# Altium PCB PowerCutMonitor-v1.0.PcbDoc (part 2 of 2)
Units mil, origin at the board's own origin, x right, y up, seen from the top; angles counter-clockwise.
Board outline 3267.72 x 1141.73 mil, 2 copper layers (Top Layer, Bottom Layer), stack 61.811 mil thick; 45 components, 28 nets, 151 pads, 51 vias.
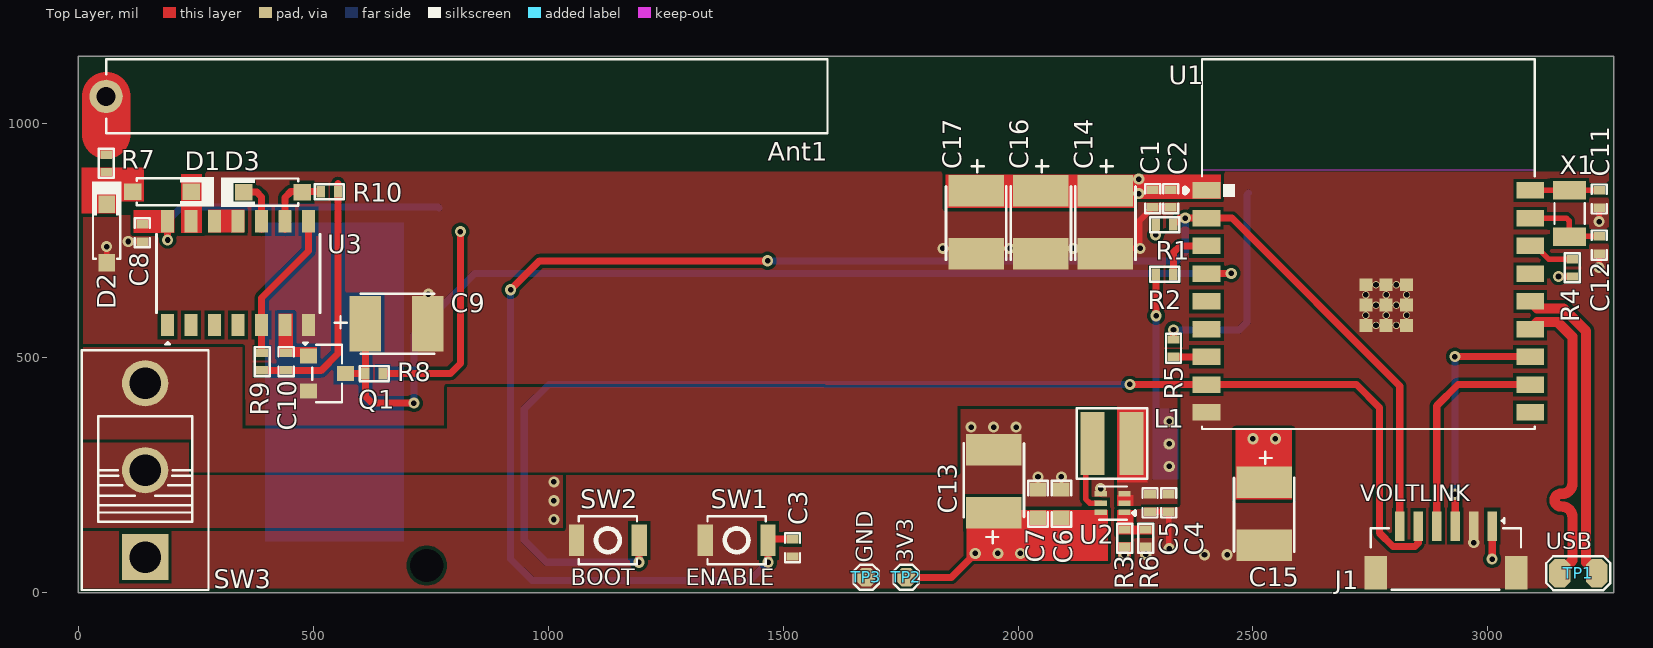
[diagram p0: Top Layer view]

## Via types
v1: diameter 23.62, hole 11.81, Top Layer to Bottom Layer, tented both sides, 51 vias

## Nets (pads, with @x,y where several pads share a name; then routed paths per layer and width w, separated by ;. In a path a pad name is that pad's centre, name@x,y a point inside that pad or via, vN(x,y) a via of type N, cw(c..) or ccw(c..) an arc to the next point about the centre after c; other vN are vias at no path point) (continued)
USB_D_N: (continued)
  Top Layer w22: U1.13 3105.41,576.27 3149,576.27 3180.13,545.14 3180.13,270.7 3180.13,232.7 cw(c3158.13,232.7) 3158.13,210.7 3155.8,210.7 ccw(c3155.8,197.2) 3155.8,183.7 3158.13,183.7 cw(c3158.13,161.7) 3180.13,161.7 3180.13,109.73 3180.13,68.6 TP1.1
USB_D_P: TP1.2 U1.14 | length 669.8
  Top Layer w22: U1.14 3105.41,605.27 3161.01,605.27 3209.13,557.15 3209.13,64.6 TP1.2
XTAL_32K_N: C12.2 U1.17 X1.2 | length 182
  Top Layer w12: U1.17 3167.27,797.46 3173,791.73 3173,759.31 X1.2 3174.43,758.73 C12.2
XTAL_32K_P: C11.2 U1.18 X1.1 | length 146.7
  Top Layer w12: U1.18 3236.79,856.52 C11.2
pads on no net: J2.S39 SW3.1 U1.5 U1.6 U1.10 U1.15 U3.1 U3.2 U3.3 U3.4

## Polygon pours and split planes (outlines as drawn)
3V# on Bottom Layer "3V#_L02_P008" (solid, remove dead copper, pour order 8): 2891.31,8 2891.31,348 2422,348 2422,203 1105,203 1105,250 986,250 986,138 2592,138 2592,8
GND on Bottom Layer "GND_L02_P001" (solid, remove dead copper, pour order 1): 0,-68.27 0,1141.73 3276,1141.73 3276,-68.27
3V3 on Bottom Layer "3V3_L02_P000" (solid, remove dead copper, pour order 0): 2243,6.73 1888,6.73 1888,135 2246,135 2246,61.73 2983,61.73 2983,693.73 3115,693.73 3115,825.73 2318,825.73 2318,751.73 746,751.73 746,890.73 3164,890.73 3164,693.73 3165,693.73 3165,652.73 3028,652.73 3028,6.73
3V on Top Layer "3V_L01_P006" (solid, remove dead copper, pour order 6): 5,523 348.23,523 348.23,465.58 349,349 785,349 785,438 1586,438 1586,436 2339,436 2339,185 2211,185 2211,398 1871,398 1871,257 242,257 242,327 5,327
3V# on Top Layer "3V#_L01_P007" (solid, remove dead copper, pour order 7): 10.2,327 10.2,138 1031,138 1031,257 242,257 242,327
GND on Top Layer "GND_L01_P002" (solid, remove dead copper, pour order 2): 0,-68.27 0,1141.73 3276,1141.73 3276,-68.27

## Other copper
Top Layer:
  rectangle net 3V#: 2463,199 2583,348
  rectangle net NetD1_1: 7,833 140,905
  rectangle net 3V3: 1846,818.73 2248,890.73
  rectangle net 3V: 2211,235 2276,391.66
  rectangle net 3V3: 2213,68.73 2241,107.73
  rectangle net 3V3: 1846,838.73 2432,890.73
  rectangle net NetR3_1: 2211,123.73 2246,176.73
  rectangle net NetR3_1: 2213,123.73 2285,143.73
  rectangle net 3V: 2211,184.73 2246,207.73
  region net 3V3: 2191.5,176.73 1890.5,176.73 1890.5,67.73 2191.5,67.73
  rectangle net NetC10_2: 434,501.73 508,522.73
  rectangle net NetC10_2: 426,501.73 457,594.73
  rectangle net NetU3_11: 276,766.73 354,815.73
  rectangle net 3V3: 117,765.73 204,814.73
  rectangle net NetD1_2: 218,765.73 263,891.73
  rectangle net NetD1_1: 7,807 81,905
  pour cut-out: 2126.07,391.66 2126.07,244.73 2276,244.73 2276,391.66
  pour cut-out: 263,765.73 215,765.73 215,804 1,804 1,896.73 263,896.73
  pour cut-out: 3267.72,1140.73 3267.72,896.73 1,896.73 1,1140.73
Bottom Layer:
  rectangle net 3V: 2286.5,241 2341.5,392
  rectangle net NetJ2_2: 397,109.73 693,787.73
  pour cut-out: 0,1141.73 0,897.73 3267.72,897.73 3267.72,1141.73

## Silkscreen, mask and mechanical layers (free items; w line width, h text height)
Top Overlay:
  text "VOLTLINK" at 2729,182.72 h60
  text "USB" at 3123.5,80.72 h60
  text "GND" at 1702.01,63.5 h60 r90
  text "3V3" at 1789.01,63.5 h60 r90
  text "BOOT" at 1048.02,4.81 h60
  text "ENABLE" at 1293,4.86 h60
Bottom Overlay:
  text "BATTERY" at 2721,896.72 h60
Fabrication_Layer:
  drawing of 191 lines, arcs and shapes, not listed
  text "Layer" at 3544.5,1868 h60
  text "Name" at 3954.41,1868 h60
  text "Material" at 4884.16,1868 h60
  text "Thickness" at 5743.92,1868 h60
  text "Constant" at 6393.76,1868 h60
  text "Board Layer Stack" at 6963.62,1868 h60
  text "Top Overlay" at 3954.41,1748 h60
  text "Top Solder" at 3954.41,1628 h60
  text "Solder Resist" at 4884.16,1628 h60
  text "0.39mil" at 5743.92,1628 h60
  text "3.5" at 6393.76,1628 h60
  text "1" at 3544.5,1508 h60
  text "Top Layer" at 3954.41,1508 h60
  text "1.38mil" at 5743.92,1508 h60
  text "Dielectric 1" at 3954.41,1388 h60
  text "FR-4" at 4884.16,1388 h60
  text "59.06mil" at 5743.92,1388 h60
  text "4.8" at 6393.76,1388 h60
  text "2" at 3544.5,1268 h60
  text "Bottom Layer" at 3954.41,1268 h60
  text "1.38mil" at 5743.92,1268 h60
  text "Bottom Solder" at 3954.41,1148 h60
  text "Solder Resist" at 4884.16,1148 h60
  text "0.39mil" at 5743.92,1148 h60
  text "3.5" at 6393.76,1148 h60
  text "Bottom Overlay" at 3954.41,1028 h60
  text "Total board thickness:" at 3544.5,908 h60
  text "62.60mil" at 5743.92,908 h60
Board_Outline:
  the board outline again, w5
Drill Drawing:
  circle w10: c3605.62,548.83 r33.33
  lines w10: 3572.29,65.5 3638.96,65.5 3638.96,132.17 3572.29,132.17 3572.29,65.5 ; 3572.29,232.17 3588.96,232.17 3605.62,215.5 3622.29,232.17 3638.96,232.17 3622.29,248.83 3638.96,265.5 3622.29,265.5 3605.62,282.17 3588.96,265.5 3572.29,265.5 3588.96,248.83 3572.29,232.17 ; 3572.29,432.17 3638.96,432.17 3605.62,365.5 3572.29,432.17
  lines w15: 3512.5,20.5 16206.96,20.5 ; 3512.5,620.5 16206.96,620.5 ; 4063.38,-129.5 4063.38,770.5 ; 4603.24,-129.5 4603.24,770.5 ; 5692.92,-129.5 5692.92,770.5 ; 6198.8,-129.5 6198.8,770.5 ; 6932.6,-129.5 6932.6,770.5 ; 8432.15,-129.5 8432.15,770.5 ; 9022,-129.5 9022,770.5 ; 9767.79,-129.5 9767.79,770.5 ; 10417.62,-129.5 10417.62,770.5 ; 11271.39,-129.5 11271.39,770.5 ; 12604.99,-129.5 12604.99,770.5 ; 13938.6,-129.5 13938.6,770.5 ; 14804.36,-129.5 14804.36,770.5 ; 3512.5,-129.5 16206.96,-129.5 16206.96,770.5 3512.5,770.5 3512.5,-129.5
  text "Symbol" at 3602.5,665.5 h72
  text "Count" at 4108.38,665.5 h72
  text "Hole Size" at 4648.24,665.5 h72
  text "Plated" at 5737.92,665.5 h72
  text "Hole Type" at 6243.8,665.5 h72
  text "Drill Layer Pair" at 6977.6,665.5 h72
  text "Via/Pad" at 8477.15,665.5 h72
  text "Pad Shape" at 9067,665.5 h72
  text "Template" at 9812.79,665.5 h72
  text "Description" at 10462.62,665.5 h72
  text "Hole Tolerance (+)" at 11316.39,665.5 h72
  text "Hole Tolerance (-)" at 12649.99,665.5 h72
  text "Hole Length" at 13983.6,665.5 h72
  text "Routed Path Length" at 14849.36,665.5 h72
  text "1" at 4108.38,515.5 h60
  text "1.020mm (40.16mil)" at 4648.24,515.5 h60
  text "PTH" at 5737.92,515.5 h60
  text "Round" at 6243.8,515.5 h60
  text "Top Layer - Bottom Layer" at 6977.6,515.5 h60
  text "Pad" at 8477.15,515.5 h60
  text "Rounded" at 9067,515.5 h60
  text "c180h102" at 9812.79,515.5 h60
  text "-" at 13983.6,515.5 h60
  text "-" at 14849.36,515.5 h60
  text "1" at 4108.38,365.5 h60
  text "1.800mm (70.87mil)" at 4648.24,365.5 h60
  text "NPTH" at 5737.92,365.5 h60
  text "Round" at 6243.8,365.5 h60
  text "Top Layer - Bottom Layer" at 6977.6,365.5 h60
  text "Pad" at 8477.15,365.5 h60
  text "Rounded" at 9067,365.5 h60
  text "c0hn180" at 9812.79,365.5 h60
  text "-" at 13983.6,365.5 h60
  text "-" at 14849.36,365.5 h60
  text "3" at 4108.38,215.5 h60
  text "1.700mm (66.93mil)" at 4648.24,215.5 h60
  text "PTH" at 5737.92,215.5 h60
  text "Round" at 6243.8,215.5 h60
  text "Top Layer - Bottom Layer" at 6977.6,215.5 h60
  text "Pad" at 8477.15,215.5 h60
  text "(Mixed)" at 9067,215.5 h60
  text "(Mixed)" at 9812.79,215.5 h60
  text "-" at 13983.6,215.5 h60
  text "-" at 14849.36,215.5 h60
  text "63" at 4108.38,65.5 h60
  text "0.300mm (11.81mil)" at 4648.24,65.5 h60
  text "PTH" at 5737.92,65.5 h60
  text "Round" at 6243.8,65.5 h60
  text "Top Layer - Bottom Layer" at 6977.6,65.5 h60
  text "(Mixed)" at 8477.15,65.5 h60
  text "Rounded" at 9067,65.5 h60
  text "(Mixed)" at 9812.79,65.5 h60
  text "-" at 13983.6,65.5 h60
  text "-" at 14849.36,65.5 h60
  text "68 Total" at 4108.38,-84.5 h60

## Dimensions
3267.72,1141.73 to 3267.72,0 on Dimension
0,1141.73 to 3267.72,1141.73 on Dimension